# Altium PCB OFP_MCM_v1.6.PcbDoc (part 5 of 8)
Units mm, origin at the board's own origin, x right, y up, seen from the top; angles counter-clockwise.
Board outline 110 x 120 mm, 4 copper layers (Top Layer, Layer 1, Layer 2, Bottom Layer), stack 1.576 mm thick; 381 components, 285 nets, 1332 pads, 552 vias.
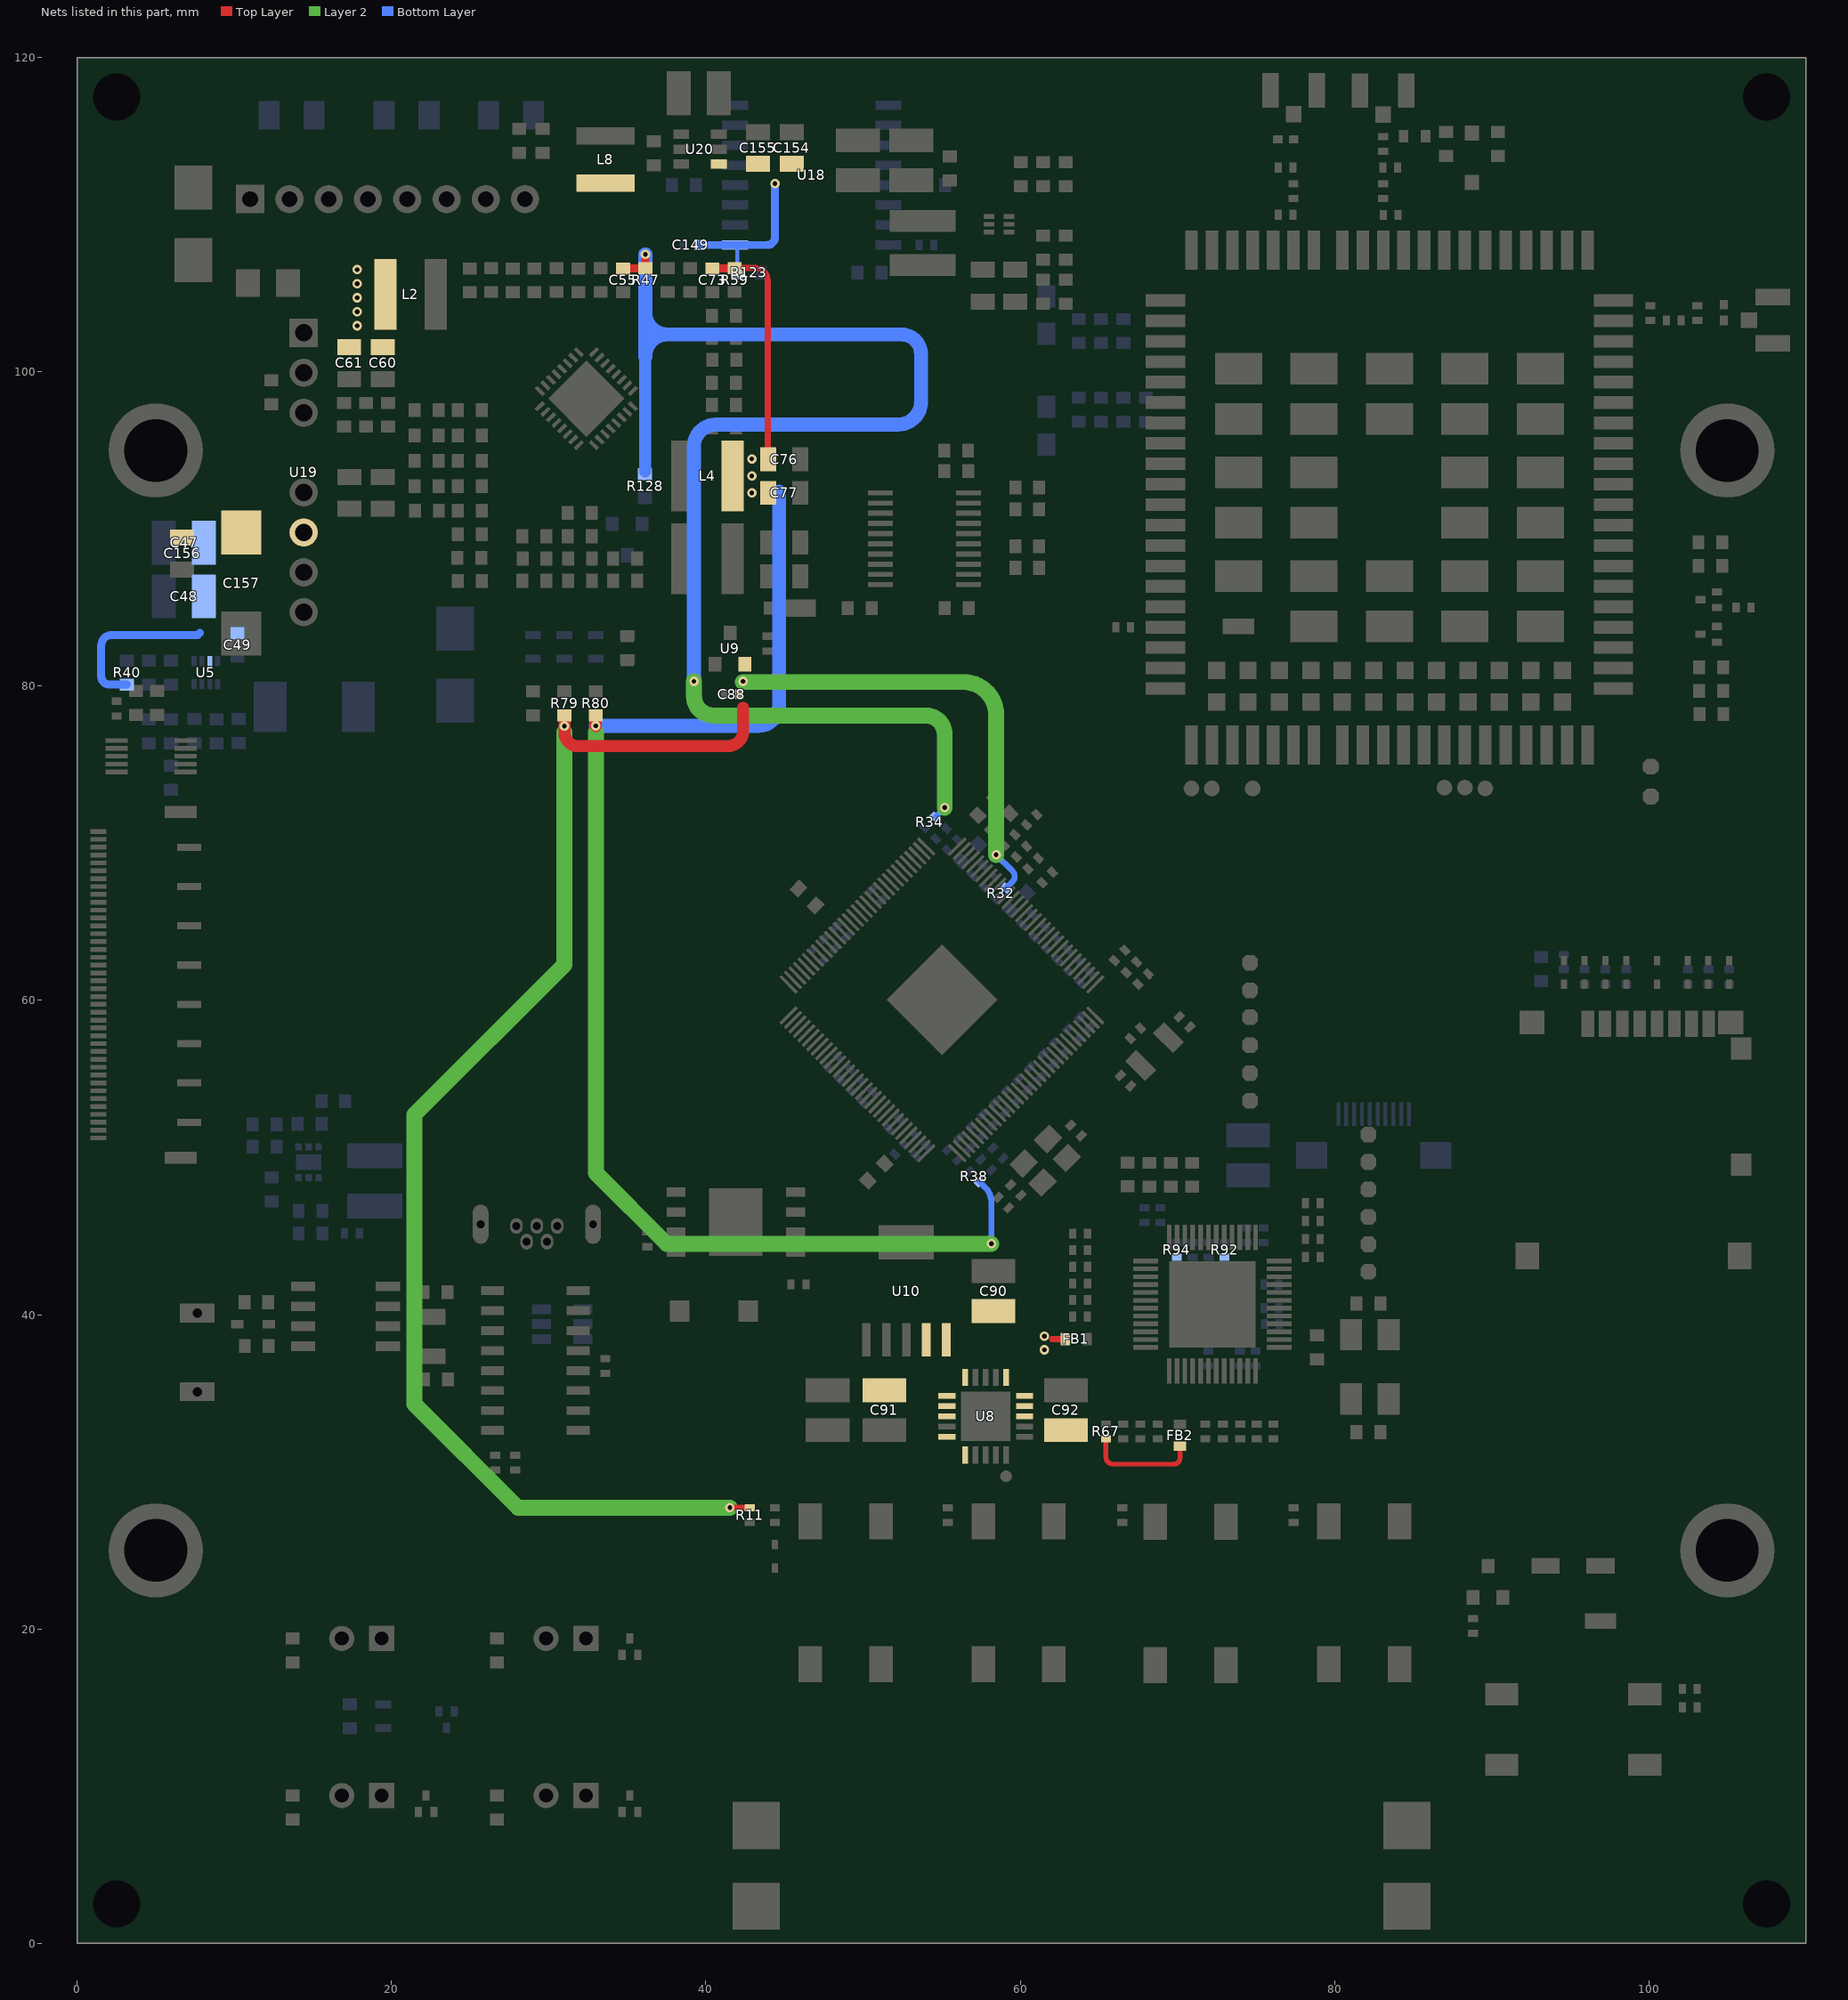
[diagram p4: the nets of this part, all layers, seen from the top]

## Part data (continued)
R79: library part RC0603FR-07499RL, "RES 499 OHM 1% 1/10W 0603", Case Code (Imperial)=0603, Case Code (Metric)=1608, LCSC Part Number=C137714, Manufacturer=Yageo, Max Operating Temperature=155°C, Max Power Dissipation=100mW, Min Operating Temperature=-55°C, Package Quantity=1, Resistor Type="Thick Film", Supplier Part Number 1=1995585, Temperature Coefficient=100ppm/°C, Tolerance=1%, Voltage Rating=50V, Case/Package=0603, Category="Chip SMD Resistors", ComponentLink1Description=https://datasheet.ciiva.com/11808/0900766b80f96399-11808558.pdf?src-supplier=RSComponents, ComponentLink1URL=https://datasheet.ciiva.com/11808/0900766b80f96399-11808558.pdf?src-supplier=RSComponents, ComponentLink2Description=https://datasheet.ciiva.com/2453/pyu-r-int-thick-7-2453956.pdf?src-supplier=Digi-Key, ComponentLink2URL=https://datasheet.ciiva.com/2453/pyu-r-int-thick-7-2453956.pdf?src-supplier=Digi-Key, ComponentLink3Description=https://datasheet.ciiva.com/2453/pyu-r-int-thick-7-2453957.pdf?src-supplier=Digi-Key, ComponentLink3URL=https://datasheet.ciiva.com/2453/pyu-r-int-thick-7-2453957.pdf?src-supplier=Digi-Key, ComponentLink4Description=https://datasheet.ciiva.com/2453/pyu-r-int-thick-7-2453955.pdf?src-supplier=Digi-Key, ComponentLink4URL=https://datasheet.ciiva.com/2453/pyu-r-int-thick-7-2453955.pdf?src-supplier=Digi-Key, ComponentLink5Description=https://datasheet.ciiva.com/12558/rc0603-272842-12558391.pdf?src-supplier=Mouser, ComponentLink5URL=https://datasheet.ciiva.com/12558/rc0603-272842-12558391.pdf?src-supplier=Mouser, ComponentLink6Description=https://datasheet.ciiva.com/8885/pyu-rc0603-51-rohs-l-4-8885483.pdf?src-supplier=Avnet, ComponentLink6URL=https://datasheet.ciiva.com/8885/pyu-rc0603-51-rohs-l-4-8885483.pdf?src-supplier=Avnet, Construction=Rectangular, Contact Plating=Tin,Matte, Depth=0.8mm, Features="Moisture Resistant", Height=0.45mm, Lead Free="Lead Free", Length=1.6mm, Manufacturer Part Number=RC0603FR-07499RL, Military Standard=Not, Mount="Surface Mount", Number of Terminations=2, Packaging="Tape and Reel", Power Rating=100mW, Pricing 1="5000=0.00300, 10000=0.00300, 15000=0.00300, 20000=0.00200 (GBP)", Radiation Hardening=No, Resistance=499R, RoHS=Yes, RoHS Compliant=Yes, Series=RC, Size Code=0603, Stock 1=900, Supplier 1=RSComponents, Technology="THICK FILM", Termination=SMD/SMT, Voltage Rating (DC)=50V, Width=0.031inch
R80: library part RC0603FR-07100RL, "RES SMD 100 OHM 1% 1/10W 0603", Case Code (Imperial)=0603, Case Code (Metric)=1608, LCSC Part Number=C105588, Manufacturer=Yageo, Max Operating Temperature=155°C, Max Power Dissipation=100mW, Min Operating Temperature=-55°C, Resistance Tolerance=1%, Resistor Type="Thick Film", Temperature Coefficient=100ppm/°C, Voltage Rating=50V, Case/Package=0603, Category="Chip SMD Resistors", Construction=Rectangular, Depth=0.8mm, Features="Moisture Resistant", Height=0.45mm, Item Type=Resistor, Lead Free="Lead Free", Length=1.6mm, Manufacturer Part Number=RC0603FR-07100RL, Military Standard=Not, Number of Pins=2, Number of Terminations=2, Packaging="Tape and Reel", Power Rating=100mW, Pricing 1="5000=0.00300, 5000=0.00200, 5000=0.00450, 50000=0.00410, 500000=0.00230, 2500000=0.00140 (USD)", REACH SVHC=Unknown, Resistance=100R, RoHS=Yes, RoHS Compliant=Yes, Series=RC, Size Code=0603, Stock 1=3800000, Supplier 1="Arrow Electronics", Supplier Part Number 1=RC0603FR-07100RL, Technology="THICK FILM", Termination=SMD/SMT, Tolerance=1%, Voltage Rating (DC)=50V, Width=0.8mm
R86: library part RC0603FR-0710RL, "RES SMD 10 OHM 1% 1/10W 0603", Case Code (Imperial)=0603, Case Code (Metric)=1608, LCSC Part Number=C109318, Manufacturer=Yageo, Max Operating Temperature=155°C, Min Operating Temperature=-55°C, Power Rating=100mW, Supplier Part Number 1=311-10.0HRDKR-ND, Temperature Coefficient=200ppm/°C, Tolerance=1%, Voltage Rating=50V, Case/Package=0603, ComponentLink1Description=http://www.farnell.com/datasheets/1868787.pdf?src-supplier=Element14, ComponentLink1URL=http://www.farnell.com/datasheets/1868787.pdf?src-supplier=Element14, ComponentLink2Description=http://www.yageo.com/documents/recent/PYu-RC0603_51_RoHS_L_4.pdf?src-supplier=Avnet, ComponentLink2URL=http://www.yageo.com/documents/recent/PYu-RC0603_51_RoHS_L_4.pdf?src-supplier=Avnet, ComponentLink3Description=http://documents.rs-components.com/techlib://itc_doclist_GB.htm?stockno=5048984&src-supplier=RSComponents, ComponentLink3URL=http://documents.rs-components.com/techlib://itc_doclist_GB.htm?stockno=5048984&src-supplier=RSComponents, ComponentLink4Description=http://www.yageo.com/documents/recent/PYu-RC0603_51_RoHS_L_4.pdf?src-supplier=Avnet+Europe, ComponentLink4URL=http://www.yageo.com/documents/recent/PYu-RC0603_51_RoHS_L_4.pdf?src-supplier=Avnet+Europe, Composition="Thick Film", Contact Plating=Tin,Matte, Depth=0.8mm, Height=0.45mm, Item Type=Resistor, Lead Free="Lead Free", Length=1.6mm, Manufacturer Part Number=RC0603FR-0710RL, Military Standard=Not, Number of Pins=2, Packaging="Tape and Reel", Pricing 1="1=0.1, 10=0.046, 100=0.0187, 1000=0.0084, 2500=0.00729 (USD)", Radiation Hardening=No, REACH SVHC="No SVHC", Resistance=10R, Stock 1=10836596, Supplier 1=Digi-Key, Termination=SMD/SMT, Voltage Rating (DC)=50V, Width=0.8mm
R87: library part RT0402BRE079K53L, "63mW Thin Film Resistor ±50ppm/℃ ±0.1% 9.53kΩ 0402 Chip Resistor - Surface Mount ROHS", Case/Package=0402, LCSC Part Number=C853448, Manufacturer=Yageo, Max Operating Temperature=155°C, Max Power Dissipation=63mW, Min Operating Temperature=-55°C, Temperature Coefficient=50ppm/°C, Tolerance=0.1%, Voltage Rating=50V, ComponentLink1Description=https://datasheet.ciiva.com/2582/pyu-rt-1-to-0-05-rohs-l-5-2582995.pdf?src-supplier=Digikey, ComponentLink1URL=https://datasheet.ciiva.com/2582/pyu-rt-1-to-0-05-rohs-l-5-2582995.pdf?src-supplier=Digikey, Item Type=Resistors, Lead Free="Lead Free", Manufacturer Part Number=RT0402BRE079K53L, Number of Terminations=2, Packaging="Tape and Reel", Pricing="10000=0.074, 20000=0.064, 30000=0.059, 50000=0.052 (USD)", RoHS=Yes, RoHS Compliant=Yes, Series=RT, Supplier=Newark, Voltage Rating (DC)=50V
R88: library part RC0603FR-0790K9L, "RES 90.9K OHM 1% 1/10W 0603", LCSC Part Number=C185305, Manufacturer=Yageo, Voltage Rating (DC)=50V, ComponentLink1Description=https://datasheet.ciiva.com/15189/getdatasheetpartid-325203-15189835.pdf?src-supplier=Verical, ComponentLink1URL=https://datasheet.ciiva.com/15189/getdatasheetpartid-325203-15189835.pdf?src-supplier=Verical, Item Type=Resistors, Lead Free=5697LeadFree, Manufacturer Part Number=RC0603FR-0790K9L, Pricing="5000=0.0022, 50000=0.0021, 150000=0.0021, 375000=0.002, 1000000=0.0019 (USD)", RoHS=Yes, RoHS Compliant=5897YesNo, Stock=100000, Supplier="Future Electronics"
R93: library part RC0603FR-071ML, "RES SMD 1M OHM 1% 1/10W 0603", Case Code (Imperial)=0603, Case Code (Metric)=1608, LCSC Part Number=C105578, Manufacturer=Yageo, Max Operating Temperature=155°C, Min Operating Temperature=-55°C, Package Quantity=5000, Power Rating=100mW, Resistance=1MR, Supplier Part Number 1=311-1.00MHRDKR-ND, Temperature Coefficient=100ppm/°C, Tolerance=1%, Voltage Rating=50V, Case/Package=0603, ComponentLink1Description=http://www.farnell.com/datasheets/2167052.pdf?src-supplier=Mouser, ComponentLink1URL=http://www.farnell.com/datasheets/2167052.pdf?src-supplier=Mouser, ComponentLink2Description=http://www.farnell.com/datasheets/2167052.pdf?src-supplier=Element14, ComponentLink2URL=http://www.farnell.com/datasheets/2167052.pdf?src-supplier=Element14, ComponentLink3Description=http://documents.rs-components.com/techlib://itc_doclist_GB.htm?stockno=5048956&src-supplier=RSComponents, ComponentLink3URL=http://documents.rs-components.com/techlib://itc_doclist_GB.htm?stockno=5048956&src-supplier=RSComponents, Composition="Thick Film", Depth=0.8mm, Height=0.45mm, Item Type=Resistor, Lead Free="Lead Free", Length=1.6mm, Manufacturer Part Number=RC0603FR-071ML, Military Standard=Not, Number of Pins=2, Packaging="Tape and Reel", Pricing 1="1=0.1, 10=0.023, 100=0.0094, 1000=0.00421, 2500=0.00366 (USD)", REACH SVHC="No SVHC", Stock 1=3824601, Supplier 1=Digi-Key, Termination=SMD/SMT, Voltage Rating (DC)=50V, Width=0.8mm
R95 R103: library part RC0603FR-071KL, "RES SMD 1K OHM 1% 1/10W 0603", Case Code (Imperial)=0603, Case Code (Metric)=1608, LCSC Part Number=C22548, Manufacturer=Yageo, Max Operating Temperature=155°C, Min Operating Temperature=-55°C, Power Rating=100mW, Resistance=1kR, Supplier Part Number 1=311-1.00KHRDKR-ND, Temperature Coefficient=100ppm/°C, Tolerance=1%, Voltage Rating=50V, Case/Package=0603, ComponentLink1Description=https://www.verical.com/server-webapp/html/getDatasheet?partID=409289&src-supplier=Verical, ComponentLink1URL=https://www.verical.com/server-webapp/html/getDatasheet?partID=409289&src-supplier=Verical, ComponentLink2Description=http://documents.rs-components.com/techlib://itc_doclist_GB.htm?stockno=5048928&src-supplier=RSComponents, ComponentLink2URL=http://documents.rs-components.com/techlib://itc_doclist_GB.htm?stockno=5048928&src-supplier=RSComponents, ComponentLink3Description=http://www.yageo.com/documents/recent/PYu-RC0603_51_RoHS_L_4.pdf?src-supplier=Avnet+Europe, ComponentLink3URL=http://www.yageo.com/documents/recent/PYu-RC0603_51_RoHS_L_4.pdf?src-supplier=Avnet+Europe, ComponentLink4Description=http://www.farnell.com/datasheets/2167052.pdf?src-supplier=Element14, ComponentLink4URL=http://www.farnell.com/datasheets/2167052.pdf?src-supplier=Element14, ComponentLink5Description=http://www.farnell.com/datasheets/1868787.pdf?src-supplier=Element14, ComponentLink5URL=http://www.farnell.com/datasheets/1868787.pdf?src-supplier=Element14, ComponentLink6Description=http://www.yageo.com/documents/recent/PYu-RC_Group_51_RoHS_L_2.pdf?src-supplier=Avnet, ComponentLink6URL=http://www.yageo.com/documents/recent/PYu-RC_Group_51_RoHS_L_2.pdf?src-supplier=Avnet, ComponentLink7Description=https://www.verical.com/server-webapp/html/getDatasheet?partID=404327&src-supplier=Verical, ComponentLink7URL=https://www.verical.com/server-webapp/html/getDatasheet?partID=404327&src-supplier=Verical, ComponentLink8Description=http://www.farnell.com/datasheets/443971.pdf?src-supplier=Element14, ComponentLink8URL=http://www.farnell.com/datasheets/443971.pdf?src-supplier=Element14, Composition="Thick Film", Contact Plating=Tin,Matte, Depth=0.8mm, Height=0.45mm, Item Type=Resistor, Lead Free="Lead Free", Length=1.6mm, Manufacturer Part Number=RC0603FR-071KL, Military Standard=Not, Packaging="Tape and Reel", Pricing 1="1=0.1, 10=0.023, 100=0.0094, 1000=0.0042, 2500=0.0037 (USD)", Radiation Hardening=No, REACH SVHC="No SVHC", Stock 1=21472395, Supplier 1=Digi-Key, Termination=SMD/SMT
R102: library part RC0603FR-0747KL, "RES 47K OHM 1% 1/10W 0603", Case Code (Imperial)=0603, Case Code (Metric)=1608, LCSC Part Number=C105579, Manufacturer=Yageo, Max Operating Temperature=155°C, Max Power Dissipation=100mW, Min Operating Temperature=-55°C, Package Quantity=1, Resistance Tolerance=1%, Resistor Type="Thick Film", Temperature Coefficient=100ppm/°C, Voltage Rating=50V, Case/Package=0603, Depth=0.8mm, Features="Moisture Resistant", Height=0.022inch, Item Type=Resistors, Lead Free=5697LeadFree, Length=0.063inch, Manufacturer Part Number=RC0603FR-0747KL, Number of Terminations=2, Packaging="Tape and Reel", Pins=2, Power Rating=100mW, Pricing="100=0.078, 1000=0.071, 2500=0.068, 5000=0.062, 10000=0.057 (SEK)", Radiation Hardening=5898YesNo, Reach SVHC Compliant=Unknown, RoHS=Yes, RoHS Compliant=Yes, Series=RC, Stock=3100, Supplier=Rs, Technology="THICK FILM", Termination=SMD/SMT, Tolerance=1%, Voltage Rating (AC)=50V, Voltage Rating (DC)=50V, Width=0.031inch
R105 R106 R107 R108: library part RC0603FR-0722RL, "RES 22 OHM 1% 1/10W 0603", Case Code (Imperial)=0603, Case Code (Metric)=1608, LCSC Part Number=C107701, Manufacturer=Yageo, Max Operating Temperature=155°C, Max Power Dissipation=100mW, Min Operating Temperature=-55°C, Package Quantity=1, Resistance Tolerance=1%, Resistor Type="Thick Film", Temperature Coefficient=100ppm/°C, Voltage Rating=50V, Case/Package=0603, Category="Chip SMD Resistors", ComponentLink1Description=https://datasheet.ciiva.com/11819/0900766b80f96399-11819285.pdf?src-supplier=RSComponents, ComponentLink1URL=https://datasheet.ciiva.com/11819/0900766b80f96399-11819285.pdf?src-supplier=RSComponents, ComponentLink2Description=https://datasheet.ciiva.com/46395/443971-46395032.pdf?src-supplier=Element14, ComponentLink2URL=https://datasheet.ciiva.com/46395/443971-46395032.pdf?src-supplier=Element14, ComponentLink3Description=https://datasheet.ciiva.com/46440/1868787-46440901.pdf?src-supplier=Element14, ComponentLink3URL=https://datasheet.ciiva.com/46440/1868787-46440901.pdf?src-supplier=Element14, ComponentLink4Description=https://datasheet.ciiva.com/2454/pyu-r-int-thick-7-2454355.pdf?src-supplier=Digi-Key, ComponentLink4URL=https://datasheet.ciiva.com/2454/pyu-r-int-thick-7-2454355.pdf?src-supplier=Digi-Key, ComponentLink5Description=https://datasheet.ciiva.com/2454/pyu-r-int-thick-7-2454356.pdf?src-supplier=Digi-Key, ComponentLink5URL=https://datasheet.ciiva.com/2454/pyu-r-int-thick-7-2454356.pdf?src-supplier=Digi-Key, ComponentLink6Description=https://datasheet.ciiva.com/2454/pyu-r-int-thick-7-2454354.pdf?src-supplier=Digi-Key, ComponentLink6URL=https://datasheet.ciiva.com/2454/pyu-r-int-thick-7-2454354.pdf?src-supplier=Digi-Key, Construction=Rectangular, Depth=0.8mm, Features="Moisture Resistant", Height=0.022inch, Item Type=Resistor, Lead Free="Lead Free", Length=0.063inch, Manufacturer Part Number=RC0603FR-0722RL, Military Standard=Not, Number of Pins=2, Number of Terminations=2, Packaging="Tape and Reel", Power Rating=100mW, Pricing 1="5000=0.00133, 10000=0.00131, 20000=0.00127 (USD)", Reach SVHC Compliant=Yes, Resistance=22R, RoHS=Yes, RoHS Compliant=Yes, Series=RC, Size Code=0603, Stock 1=190000, Supplier 1=Avnet, Supplier Part Number 1=RC0603FR-0722RL, Technology="THICK FILM", Termination=SMD/SMT, Tolerance=1%, Voltage Rating (DC)=50V, Width=0.031inch
R111: library part RC0603FR-074K7L, "RES SMD 4.7K OHM 1% 1/10W 0603", LCSC Part Number=C99782, Manufacturer=Yageo, Package=0603, ComponentLink7Description=LCSC, ComponentLink7URL=https://www.lcsc.com/product-detail/Chip-Resistor-Surface-Mount_YAGEO-RC0603FR-074K7L_C99782.html, Item Type=Resistor, Manufacturer Part Number=RC0603FR-074K7L
R112: library part RC0603FR-0710RL, "RES SMD 10 OHM 1% 1/10W 0603", Case Code (Imperial)=0603, Case Code (Metric)=1608, LCSC Part Number=C109318, Manufacturer=Yageo, Max Operating Temperature=155°C, Min Operating Temperature=-55°C, Power Rating=100mW, Resistance=10R, Supplier Part Number 1=311-10.0HRDKR-ND, Temperature Coefficient=200ppm/°C, Tolerance=1%, Voltage Rating=50V, Case/Package=0603, ComponentLink1Description=http://www.farnell.com/datasheets/1868787.pdf?src-supplier=Element14, ComponentLink1URL=http://www.farnell.com/datasheets/1868787.pdf?src-supplier=Element14, ComponentLink2Description=http://www.yageo.com/documents/recent/PYu-RC0603_51_RoHS_L_4.pdf?src-supplier=Avnet, ComponentLink2URL=http://www.yageo.com/documents/recent/PYu-RC0603_51_RoHS_L_4.pdf?src-supplier=Avnet, ComponentLink3Description=http://documents.rs-components.com/techlib://itc_doclist_GB.htm?stockno=5048984&src-supplier=RSComponents, ComponentLink3URL=http://documents.rs-components.com/techlib://itc_doclist_GB.htm?stockno=5048984&src-supplier=RSComponents, ComponentLink4Description=http://www.yageo.com/documents/recent/PYu-RC0603_51_RoHS_L_4.pdf?src-supplier=Avnet+Europe, ComponentLink4URL=http://www.yageo.com/documents/recent/PYu-RC0603_51_RoHS_L_4.pdf?src-supplier=Avnet+Europe, Composition="Thick Film", Contact Plating=Tin,Matte, Depth=0.8mm, Height=0.45mm, Item Type=Resistor, Lead Free="Lead Free", Length=1.6mm, Manufacturer Part Number=RC0603FR-0710RL, Military Standard=Not, Number of Pins=2, Packaging="Tape and Reel", Pricing 1="1=0.1, 10=0.046, 100=0.0187, 1000=0.0084, 2500=0.00729 (USD)", Radiation Hardening=No, REACH SVHC="No SVHC", Stock 1=10836596, Supplier 1=Digi-Key, Termination=SMD/SMT, Voltage Rating (DC)=50V, Width=0.8mm
R113: library part RC0402FR-070RL, "RES 0 OHM JUMPER 1/16W 0402", Case Code (Imperial)=0402, Case Code (Metric)=1005, LCSC Part Number=C106231, Manufacturer=Yageo, Max Operating Temperature=155°C, Max Power Dissipation=63mW, Min Operating Temperature=-55°C, Power Rating=62.5mW, Resistance=0R, Resistor Type="Thick Film", Supplier Part Number 1=603-RC0402FR-070RL, Temperature Coefficient=200ppm/°C, Tolerance=1%, Voltage Rating=50V, Case/Package=0402, ComponentLink1Description=https://datasheet.ciiva.com/8896/pyu-rc0402-51-rohs-l-6-8896149.pdf?src-supplier=Avnet, ComponentLink1URL=https://datasheet.ciiva.com/8896/pyu-rc0402-51-rohs-l-6-8896149.pdf?src-supplier=Avnet, ComponentLink2Description=https://datasheet.ciiva.com/16790/pyu-rc0402-51-rohs-l-6-r-16790444.pdf?src-supplier=Future+Electronics, ComponentLink2URL=https://datasheet.ciiva.com/16790/pyu-rc0402-51-rohs-l-6-r-16790444.pdf?src-supplier=Future+Electronics, Contact Plating=Tin,Matte, Features="Moisture Resistant", Height=0.35mm, Item Type=Resistors, Lead Free="Lead Free", Length=1mm, Manufacturer Part Number=RC0402FR-070RL, Mount="Surface Mount", Number of Terminations=2, Packaging="Tape and Reel", Pricing 1="1=0.10000, 10=0.01400, 50=0.01400, 100=0.00600, 1000=0.00300, 5000=0.00200, 10000=0.00100 (USD)", Radiation Hardening=No, RoHS=Yes, RoHS Compliant=Yes, Series=RC, Size Code=0402, Stock 1=8556842, Supplier 1=Mouser, Termination=SMD/SMT, Width=0.5mm
R122: library part RC0402JR-0710ML, "RES SMD 10M Ohm 5% 1/16W 0402", Case Code (Imperial)=0402, Case Code (Metric)=1005, LCSC Part Number=C274900, Manufacturer=Yageo, Max Operating Temperature=155°C, Max Power Dissipation=63mW, Min Operating Temperature=-55°C, Package Quantity=1, Power Rating=62.5mW, Resistance=10MR, Resistance Tolerance=5%, Resistor Type="Thick Film", Supplier Part Number 1=311-10MJRCT-ND, Temperature Coefficient=100ppm/°C, Voltage Rating=50V, Case/Package=0402, Category="Chip SMD Resistors", ComponentLink1Description=https://datasheet.ciiva.com/7983/1018594-7983541.pdf?src-supplier=Element14, ComponentLink1URL=https://datasheet.ciiva.com/7983/1018594-7983541.pdf?src-supplier=Element14, ComponentLink2Description=https://datasheet.ciiva.com/2518/pyu-r-int-thick-7-2518904.pdf?src-supplier=Digi-Key, ComponentLink2URL=https://datasheet.ciiva.com/2518/pyu-r-int-thick-7-2518904.pdf?src-supplier=Digi-Key, ComponentLink3Description=https://datasheet.ciiva.com/2518/pyu-r-int-thick-7-2518905.pdf?src-supplier=Digi-Key, ComponentLink3URL=https://datasheet.ciiva.com/2518/pyu-r-int-thick-7-2518905.pdf?src-supplier=Digi-Key, ComponentLink4Description=https://datasheet.ciiva.com/2518/pyu-r-int-thick-7-2518906.pdf?src-supplier=Digi-Key, ComponentLink4URL=https://datasheet.ciiva.com/2518/pyu-r-int-thick-7-2518906.pdf?src-supplier=Digi-Key, ComponentLink5Description=https://datasheet.ciiva.com/12577/pyu-rc0402-51-rohs-l-6-r-12577774.pdf?src-supplier=Mouser, ComponentLink5URL=https://datasheet.ciiva.com/12577/pyu-rc0402-51-rohs-l-6-r-12577774.pdf?src-supplier=Mouser, Construction=Rectangular, Depth=0.5mm, Features="Moisture Resistant", Height=0.016inch, Lead Free="Lead Free", Length=1mm, Manufacturer Part Number=RC0402JR-0710ML, Military Standard=Not, Number of Pins=2, Number of Terminations=2, Packaging="Tape and Reel", Pricing 1="1=0.10000, 10=0.01300, 100=0.00540, 1000=0.00244, 2500=0.00212, 5000=0.00175 (USD)", REACH SVHC="No SVHC", RoHS=Yes, RoHS Compliant=Yes, Series=RC, Size Code=0402, Stock 1=38636, Supplier 1=Digi-Key, Termination=SMD/SMT, Tolerance=5%, Voltage Rating (DC)=50V, Weight=2.3E-05oz, Width=0.02inch
SW1: "SWITCH TACTILE SPST-NO 0.05A 24V", LCSC Part Number=C6558197, Manufacturer="TE Connectivity Alcoswitch", ComponentLink1Description=https://datasheet.ciiva.com/7097/1486952-7097325.pdf?src-supplier=Newark, ComponentLink1URL=https://datasheet.ciiva.com/7097/1486952-7097325.pdf?src-supplier=Newark, ComponentLink2Description=https://datasheet.ciiva.com/1530/1714712-1530976.pdf?src-supplier=Element14, ComponentLink2URL=https://datasheet.ciiva.com/1530/1714712-1530976.pdf?src-supplier=Element14, ComponentLink3Description=https://datasheet.ciiva.com/15184/getdatasheetpartid-167889-15184443.pdf?src-supplier=Verical, ComponentLink3URL=https://datasheet.ciiva.com/15184/getdatasheetpartid-167889-15184443.pdf?src-supplier=Verical, ComponentLink4Description=https://datasheet.ciiva.com/8082/eng-cs-1308111-1-switches-core-program-catalog-0308-8082682.pdf?src-supplier=Avnet, ComponentLink4URL=https://datasheet.ciiva.com/8082/eng-cs-1308111-1-switches-core-program-catalog-0308-8082682.pdf?src-supplier=Avnet, Item Type=Switches, Manufacturer Part Number=FSM6JSMATR, Number of Positions=2NUMBER, RoHS=Yes, RoHS Compliant=5897YesNo, Stock=735, Supplier=Rs
SW2: "Without bracket 50mA 4mm 100000 Times 12V 160gf 3mm 2mm Round Button Standing paste SPST SMD Tactile Switches ROHS", LCSC Part Number=C720477, Manufacturer=XUNPU, Package=SMD, ComponentLink1Description=LCSC, ComponentLink1URL=https://www.lcsc.com/product-detail/Tactile-Switches_XUNPU-TS-1088-AR02016_C720477.html?s_z=n_TS-1088-AR02016, Item Type="Tactile Switch", Manufacturer Part Number=TS-1088-AR02016
SW3 SW4 SW5 SW6: "6mm 12mm Round Button 50mA Standing paste 6mm SPST 12V SMD,6x6mm Tactile Switches ROHS", LCSC Part Number=C455124, Manufacturer=XUNPU, Package=SMD,6x6mm, ComponentLink1Description=LCSC, ComponentLink1URL=https://www.lcsc.com/product-detail/Tactile-Switches_XUNPU-TS-1002S-12026C_C455124.html?s_z=n_TS-1002S-12026C, Item Type="Tactile Switch", Manufacturer Part Number=TS-1002S-12026C
TP1 TP2 TP3 TP4 TP5 TP6 TP7 TP8 TP9 TP10 TP11 TP12 TP13 TP14 TP15: "Test Point ON", Item Type="Test Point", Manufacturer Part Number="TEST POINT 0.5mm Dia"
U1: "LQFP-128-EP(14x14) Microcontrollers (MCU/MPU/SOC) ROHS", LCSC Part Number=C2687449, Manufacturer="Allwinner Tech", Package=LQFP-128-EP(14x14), ComponentLink1Description=LCSC, ComponentLink1URL=https://www.lcsc.com/product-detail/Microcontrollers-MCU-MPU-SOC_Allwinner-Tech-V3s_C2687449.html?s_z=n_V3s, Item Type=IC, Manufacturer Part Number=V3s
U2: "IC FLASH 128MBIT SPI/QUAD 8WSON", Frequency=133MHz, LCSC Part Number=C401662, Manufacturer=Winbond, Max Operating Temperature=85°C, Min Operating Temperature=-40°C, ComponentLink1Description=http://www.winbond.com/resource-files/w25q128jv%20revf%2003272018%20plus.pdf?src-supplier=Digikey, ComponentLink1URL=http://www.winbond.com/resource-files/w25q128jv%20revf%2003272018%20plus.pdf?src-supplier=Digikey, Item Type=IC, Manufacturer Part Number=W25Q128JVEIQ, Memory Format=Non-Volatile,FLASH, Memory Size=128Mb, Mounting Technology="Surface Mount", Packaging=Rail/Tube, Pricing="1=1.92, 10=1.701, 25=1.6224, 63=1.54651, 126=1.49183, 252=1.43909, 504=1.38821, 1008=1.33908, 5040=1.23141 (USD)", RoHS=Yes, RoHS Compliant=Yes, Series=SpiFlash®, Stock=12733, Supplier=Digikey
U3: "IC RTC CLOCK/CALENDAR I2C 8SO", LCSC Part Number=C7440, Manufacturer="NXP Semiconductors", ComponentLink1Description=https://datasheet.ciiva.com/8145/pcf8563-8145180.pdf?src-supplier=Avnet, ComponentLink1URL=https://datasheet.ciiva.com/8145/pcf8563-8145180.pdf?src-supplier=Avnet, ComponentLink2Description=https://datasheet.ciiva.com/1238/pcf8563-1238727.pdf?src-supplier=Digikey, ComponentLink2URL=https://datasheet.ciiva.com/1238/pcf8563-1238727.pdf?src-supplier=Digikey, ComponentLink3Description=https://datasheet.ciiva.com/1238/pcf8563-1238728.pdf?src-supplier=Digikey, ComponentLink3URL=https://datasheet.ciiva.com/1238/pcf8563-1238728.pdf?src-supplier=Digikey, ComponentLink4Description=https://datasheet.ciiva.com/1238/pcf8563-1238773.pdf?src-supplier=Digikey, ComponentLink4URL=https://datasheet.ciiva.com/1238/pcf8563-1238773.pdf?src-supplier=Digikey, ComponentLink5Description=https://datasheet.ciiva.com/16287/pcf8563-16287110.pdf?src-supplier=Future+Electronics, ComponentLink5URL=https://datasheet.ciiva.com/16287/pcf8563-16287110.pdf?src-supplier=Future+Electronics, Item Type=IC, Manufacturer Part Number=PCF8563T/5,518, Pricing="1=0.8372, 10=0.6546, 100=0.5322, 500=0.5102, 1000=0.4872, 2500=0.4562, 5000=0.4356, 10000=0.4016, 25000=0.3863 (USD)", RoHS=Yes, Stock=812, Supplier="Arrow Electronics"
U4: "2Mbps Transceiver USB 2.0 SOP-16 USB ICs ROHS", LCSC Part Number=C84681, Manufacturer=WCH, Package=SOP-16, ComponentLink1Description=LCSC, ComponentLink1URL=https://www.lcsc.com/product-detail/USB-ICs_WCH-Jiangsu-Qin-Heng-CH340C_C84681.html, Item Type=IC, Manufacturer Part Number=CH340C
U5: "IC REG BUCK ADJ 3A SOT583", LCSC Part Number=C3200405, Manufacturer="Texas Instruments", Supplier Part Number=595-TPS62933DRLR, Category="Voltage Regulators - Switching", Item Type=IC, Manufacturer Part Number=TPS62933DRLR, Pricing="1=0.7, 10=0.581, 50=0.581, 100=0.44, 1000=0.297, 10000=0.241 (USD)", RoHS=No, Stock=5259, Supplier=Mouser
U6: "IC REG BCK ADJ 3A/2A TRPL 32VQFN", LCSC Part Number=C138722, Manufacturer="Texas Instruments", ComponentLink1Description=https://datasheet.ciiva.com/29735/tps65261-1-29735186.pdf?src-supplier=Digikey, ComponentLink1URL=https://datasheet.ciiva.com/29735/tps65261-1-29735186.pdf?src-supplier=Digikey, Item Type=IC, Manufacturer Part Number=TPS65261RHBR, Pricing="1=2.78, 10=1.91, 50=1.91, 100=1.71, 1000=1.52, 10000=1.32 (USD)", RoHS=Yes, Stock=3449, Supplier=Mouser
U7: "IC REG BUCK ADJ 3A SOT563", LCSC Part Number=C1513007, Manufacturer="Texas Instruments", Height=600um, Item Type=IC, Length=1.6mm, Manufacturer Part Number=TPS563202DRLR, Number of Channels=1NUMBER, Pins=6NUMBER, Pricing="1=0.29, 10=0.174, 50=0.174, 100=0.131, 1000=0.125, 10000=0.109 (USD)", RoHS=Yes, Stock=5123, Supplier=Mouser, Thickness=550um, Width=1.2mm
U8: "IC REG LIN POS ADJ 1.5A 20VQFN", LCSC Part Number=C129193, Manufacturer="Texas Instruments", ComponentLink1Description=https://datasheet.ciiva.com/4885/sbvs074j-203573-4885874.pdf?src-supplier=Mouser, ComponentLink1URL=https://datasheet.ciiva.com/4885/sbvs074j-203573-4885874.pdf?src-supplier=Mouser, ComponentLink2Description=https://datasheet.ciiva.com/41462/001015037-da-01-en-ic-reg-ldo-adj-tps74801rgwr-vqfn-20-tid-41462882.pdf?src-supplier=Conrad, ComponentLink2URL=https://datasheet.ciiva.com/41462/001015037-da-01-en-ic-reg-ldo-adj-tps74801rgwr-vqfn-20-tid-41462882.pdf?src-supplier=Conrad, ComponentLink3Description=https://datasheet.ciiva.com/14278/tps74801-14278399.pdf?src-supplier=Avnet, ComponentLink3URL=https://datasheet.ciiva.com/14278/tps74801-14278399.pdf?src-supplier=Avnet, ComponentLink4Description=https://datasheet.ciiva.com/31402/tps74801-31402076.pdf?src-supplier=Farnell, ComponentLink4URL=https://datasheet.ciiva.com/31402/tps74801-31402076.pdf?src-supplier=Farnell, ComponentLink5Description=https://datasheet.ciiva.com/2044/tps74801-2044836.pdf?src-supplier=Digikey, ComponentLink5URL=https://datasheet.ciiva.com/2044/tps74801-2044836.pdf?src-supplier=Digikey, ComponentLink6Description=https://datasheet.ciiva.com/2044/tps74801-2044837.pdf?src-supplier=Digikey, ComponentLink6URL=https://datasheet.ciiva.com/2044/tps74801-2044837.pdf?src-supplier=Digikey, ComponentLink7Description=https://datasheet.ciiva.com/2044/tps74801-2044838.pdf?src-supplier=Digikey, ComponentLink7URL=https://datasheet.ciiva.com/2044/tps74801-2044838.pdf?src-supplier=Digikey, Height=1mm, Item Type=IC, Length=5mm, Manufacturer Part Number=TPS74801RGWR, Pricing="1=1.87, 10=1.33, 50=1.33, 100=1.19, 1000=1.04, 10000=1.03 (USD)", RoHS=Yes, Stock=12482, Supplier=Mouser, Thickness=900um, Width=5mm
U9: "IC REG LINEAR 3V 200MA SOT23", LCSC Part Number=C9972, Manufacturer=Torex, Output Voltage=3V, ComponentLink1Description=https://www.torexsemi.com/file/xc6206/XC6206.pdf?src-supplier=Digikey, ComponentLink1URL=https://www.torexsemi.com/file/xc6206/XC6206.pdf?src-supplier=Digikey, ComponentLink2Description=https://datasheet.octopart.com/XC6206P302MR-G-Torex-datasheet-134531119.pdf?src-supplier=TME, ComponentLink2URL=https://datasheet.octopart.com/XC6206P302MR-G-Torex-datasheet-134531119.pdf?src-supplier=TME, Item Type=IC, Manufacturer Part Number=XC6206P302MR-G, Number of Channels=1NUMBER, Pricing="1=0.68, 10=0.543, 50=0.543, 100=0.417, 1000=0.271, 10000=0.214 (USD)", RoHS=Yes, Stock=15826, Supplier=Mouser
U10: "IC REG LINEAR 3.3V 1.5A SOT223-6", Case/Package=SOT-223-6, Dropout Voltage=300mV, Input Bias Current=1mA, LCSC Part Number=595-TPS7A4533DCQR, Manufacturer="Texas Instruments", Max Operating Temperature=125°C, Max Output current=1.5A, Max Output Voltage=3.3V, Max Supply Voltage=20V, Min Current Limit=1.6A, Min Input Voltage=2.1V, Min Operating Temperature=-40°C, Package Quantity=2500, Accuracy=1%, ComponentLink1Description=https://datasheet.ciiva.com/2046/tps7a4515-2046240.pdf?src-supplier=Digikey, ComponentLink1URL=https://datasheet.ciiva.com/2046/tps7a4515-2046240.pdf?src-supplier=Digikey, ComponentLink2Description=https://datasheet.ciiva.com/29569/tps7a4501-29569717.pdf?src-supplier=Digikey, ComponentLink2URL=https://datasheet.ciiva.com/29569/tps7a4501-29569717.pdf?src-supplier=Digikey, ComponentLink3Description=https://datasheet.ciiva.com/29569/tps7a4501-29569718.pdf?src-supplier=Digikey, ComponentLink3URL=https://datasheet.ciiva.com/29569/tps7a4501-29569718.pdf?src-supplier=Digikey, ComponentLink4Description=https://datasheet.ciiva.com/29569/tps7a4501-29569719.pdf?src-supplier=Digikey, ComponentLink4URL=https://datasheet.ciiva.com/29569/tps7a4501-29569719.pdf?src-supplier=Digikey, Item Type=IC, Lead Free="Lead Free", Manufacturer Part Number=TPS7A4533DCQR, Min Output Voltage=3.3V, Number of Outputs=1, Number of Regulators=1, Output Current=1.5A, Output Type=Fixed, Output Voltage=3.3V, Packaging="Tape and Reel", Pins=6, Polarity=Positive, Pricing="1=3.2, 10=2.35, 50=2.35, 100=2.14, 1000=2, 10000=1.87 (USD)", Quiescent Current=1mA, Radiation Hardening=No, RoHS=Yes, RoHS Compliant=Yes, Series=-, Stock=854, Supplier=Mouser
U11: "MSOP-10 Touch Screen Controllers ROHS", LCSC Part Number=C219024, Manufacturer="Shenzhen Nsiway Tech", Package=MSOP-10, ComponentLink1Description=LCSC, ComponentLink1URL=https://www.lcsc.com/product-detail/Touch-Screen-Controllers_Shenzhen-Nsiway-Tech-NS2009_C219024.html?s_z=n_NS2009, Item Type=IC, Manufacturer Part Number=NS2009
U12: "IC LED DRVR RGLTR PWM 30MA 6WSON", LCSC Part Number=C702280, Manufacturer="Texas Instruments", ComponentLink1Description=https://datasheet.ciiva.com/26932/getdatasheetpartid-782062-26932814.pdf?src-supplier=Verical, ComponentLink1URL=https://datasheet.ciiva.com/26932/getdatasheetpartid-782062-26932814.pdf?src-supplier=Verical, ComponentLink2Description=https://datasheet.ciiva.com/24016/slvsbr3-261171-24016309.pdf?src-supplier=Mouser, ComponentLink2URL=https://datasheet.ciiva.com/24016/slvsbr3-261171-24016309.pdf?src-supplier=Mouser, ComponentLink3Description=https://datasheet.ciiva.com/18569/tps61158-18569084.pdf?src-supplier=Digikey, ComponentLink3URL=https://datasheet.ciiva.com/18569/tps61158-18569084.pdf?src-supplier=Digikey, Item Type=IC, Manufacturer Part Number=TPS61158DRVR, Pricing="1=0.81, 10=0.594, 50=0.594, 100=0.489, 1000=0.446, 10000=0.4 (USD)", RoHS=Yes, Stock=6942, Supplier=Mouser
U13: "IC USB 2.0 2PORT HUB IND 48HTQFP", LCSC Part Number=C2864320, Manufacturer="Texas Instruments", ComponentLink1Description=http://www.ti.com/lit/ds/symlink/tusb4020bi.pdf?src-supplier=Digikey, ComponentLink1URL=http://www.ti.com/lit/ds/symlink/tusb4020bi.pdf?src-supplier=Digikey, ComponentLink2Description=http://www.ti.com/general/docs/suppproductinfo.tsp?distId=10&amp;gotoUrl=http%3A%2F%2Fwww.ti.com%2Flit%2Fgpn%2Ftusb4020bi&src-supplier=Digikey, ComponentLink2URL=http://www.ti.com/general/docs/suppproductinfo.tsp?distId=10&amp;gotoUrl=http%3A%2F%2Fwww.ti.com%2Flit%2Fgpn%2Ftusb4020bi&src-supplier=Digikey, Item Type=IC, Manufacturer Part Number=TUSB4020BIPHPR, Pricing="1=4.5, 10=3.15, 50=3.15, 100=2.85, 1000=2.55, 10000=2.52 (USD)", RoHS=Yes, Stock=2703, Supplier=Mouser
U14: "RF TXRX MOD CELLULARCARD EDGE", Manufacturer="Quectel Wireless Solutions", Supplier Part Number=277-EC21EFA-512-STD, ComponentLink1Description=https://datasheet.octopart.com/EC21EFA-512-STD-Quectel-datasheet-163886073.pdf?src-supplier=SOS+electronic, ComponentLink1URL=https://datasheet.octopart.com/EC21EFA-512-STD-Quectel-datasheet-163886073.pdf?src-supplier=SOS+electronic, Item Type=IC, Manufacturer Part Number=EC21EFA-512-STD, Pricing="1=59.46, 10=47.77, 50=42.24, 100=40.31, 1000=38.16, 10000=38.16 (USD)", RoHS=No, Stock=210, Supplier=Mouser
U15: "IC TRANSLATOR BIDIR 20TSSOP", LCSC Part Number=C17206, Manufacturer="Texas Instruments", Package=20-TSSOP, ComponentLink1Description=LCSC, ComponentLink1URL=https://www.lcsc.com/product-detail/Translators-Level-Shifters_Texas-Instruments-TXS0108EPWR_C17206.html, Item Type=IC, Manufacturer Part Number=TXS0108EPWR
U17: "6A 12V 150W 6V Unidirectional 5V SOT-23-6 ESD and Surge Protection (TVS/ESD) ROHS", LCSC Part Number=C2827654, Manufacturer="TECH PUBLIC", Package=SOT-23-6, ComponentLink1Description=LCSC, ComponentLink1URL=https://www.lcsc.com/product-detail/ESD-and-Surge-Protection-TVS-ESD_TECH-PUBLIC-USBLC6-2SC6_C2827654.html, Item Type=(TVS/ESD), Manufacturer Part Number=USBLC6-2SC6
U18: "DG ISO 5KV 4CH CAN/RS232 16-SOIC", LCSC Part Number=C5216408, Manufacturer="Texas Instruments", Item Type=IC, Manufacturer Part Number=ISO6742FDWR, Pricing="1=2.23, 10=1.651, 25=1.506, 100=1.3468, 250=1.27092, 500=1.2252, 1000=1.18756 (USD)", RoHS=No, Stock=6799, Supplier=Digikey
U19: "10W wide-voltage input, isolated and regulated single-channel/positive-negative dual-channel output DC/DC power supply module", LCSC Part Number=C7468825, Manufacturer=YLPTEC, Package=DIP, ComponentLink1Description=LCSC, ComponentLink1URL=https://www.lcsc.com/product-detail/C7468825.html?s_z=n_VRB1212S-10WR3, Item Type=Module, Manufacturer Part Number=VRB1212S-10WR3
U20: "IC REG BUCK 3.3V 2A TSOT26", LCSC Part Number=C780769, Manufacturer=Diodes, Supplier Part Number=6109504, Category="Voltage Regulators - Switching", ComponentLink1Description=https://www.diodes.com/assets/Datasheets/AP63200-AP63201-AP63203-AP63205.pdf?src-supplier=Digi-Key, ComponentLink1URL=https://www.diodes.com/assets/Datasheets/AP63200-AP63201-AP63203-AP63205.pdf?src-supplier=Digi-Key, Item Type=IC, Manufacturer Part Number=AP63203WU-7, Pricing="3000=0.34, 6000=0.335, 9000=0.33, 12000=0.33, 15000=0.32 (USD)", RoHS=Yes, Stock=3000, Supplier="Future Electronics"
X1: library part 7M24000192, "24MHz Surface Mount Crystal 12pF ±10ppm ±10ppm SMD3225-4P Crystals ROHS", LCSC Part Number=C331579, Manufacturer="TXC Corp", Package=SMD3225-4P, ComponentLink1Description=LCSC, ComponentLink1URL=https://www.lcsc.com/product-detail/Crystals_TXC-Corp-7M24000192_C331579.html, Item Type=Crytal, Manufacturer Part Number=7M24000192
X2 X3: library part CM315D32768DZFT, "CRYSTAL 32.7680KHZ 12.5PF SMD", LCSC Part Number=C182057, Manufacturer=Citizen, ComponentLink1Description=https://datasheet.ciiva.com/16437/cm315-16437047.pdf?src-supplier=Future+Electronics, ComponentLink1URL=https://datasheet.ciiva.com/16437/cm315-16437047.pdf?src-supplier=Future+Electronics, Item Type=Crystals, Lead Free=5697LeadFree, Manufacturer Part Number=CM315D32768DZFT, Pricing="1=0.5, 10=0.432, 50=0.3892, 100=0.3723, 500=0.3358, 1000=0.32128 (USD)", RoHS=Yes, Stock=343217, Supplier=Digikey
X4: library part X503224MSB4SI, "24MHz Surface Mount Crystal 20pF ±10ppm ±20ppm SMD5032-4P Crystals ROHS", LCSC Part Number=C112587, Manufacturer=YXC, Item Type=Crystal, Manufacturer Part Number=X503224MSB4SI, Pricing="5=0.2572, 50=0.2054, 150=0.1832, 1000=0.1377, 2000=0.1253, 5000=0.1179 (USD)", RoHS=No, Stock=390, Supplier=LCSC

## Free pads (board coordinates)
  rrect13% 0.94x0.44 on Top Overlay: 1(38.115,47.805) 1(45.885,47.805)
  round 1 smd: 2(70.9,73.492) 2(72.2,73.492) 2(74.8,73.492) 2(87,73.542) 2(88.3,73.542) 2(89.6,73.492)
  rect 3x3 smd: MH1(43.2,2.35) MH2(43.2,7.5) MH3(84.6,7.5) MH4(84.6,2.35)
  rect 3x3 smd far side: MH1(43.2,2.35) MH2(43.2,7.5) MH3(84.6,7.5) MH4(84.6,2.35)
  round 0 hole 3: MH2(2.5,2.5) MH2(2.5,117.5) MH2(107.5,2.5) MH2(107.5,117.5)
  round 6 hole 4: MH2(5,25) MH2(5,95) MH2(105,25) MH2(105,95)

## Via types
v1: diameter 0.6, hole 0.3, Top Layer to Bottom Layer, tented both sides, 552 vias

## Nets (pads, with @x,y where several pads share a name; then routed paths per layer and width w, separated by ;. In a path a pad name is that pad's centre, name@x,y a point inside that pad or via, vN(x,y) a via of type N, cw(c..) or ccw(c..) an arc to the next point about the centre after c; other vN are vias at no path point)
1.1V-HUB: C92.2 FB2.1 R67.2 U8.1 U8.18 U8.19 U8.20 | length 7.1
  Top Layer w0.305: R67.2@65.459,32.108 65.459,30.943 ccw(c65.911,30.943) 65.911,30.492 69.775,30.492 ccw(c69.775,30.888) 70.172,30.888 FB2.1@70.172,31.627
3.3V-HUB: C90.2 C91.2 FB1.1 R92.2 R94.2 U8.5 U8.6 U8.7 U8.8 U8.10 U8.11 U10.4 U10.5 | length 0.9
  Top Layer w0.178: 62.019,38.443 62.019,38.45
  Top Layer w0.381: 62.019,38.45 FB1.1@62.868,38.45
  other v1: 61.544,37.77 61.544,38.625
3V3-I: C149.2 C154.2 C155.2 L8.2 R123.1 U18.1 U20.1 | length 10.3
  Bottom Layer w0.254: U18.1@41.861,108.076 41.99,107.947 R123.1@41.99,106.325
  Bottom Layer w0.508: C149.2@39.572,108.076 U18.1@41.861,108.076 43.901,108.076 ccw(c43.901,108.574) 44.399,108.574 v1(44.399,111.989)
12V: C47.2 C48.2 C49.2 C156.2 C157.1 R40.1 U5.3 U19.6 | length 10.6
  Bottom Layer w0.508: R40.1@3.162,80.095 2.074,80.095 cw(c2.074,80.645) 1.524,80.645 1.524,82.577 cw(c2.203,82.577) 2.203,83.256 7.663,83.256 7.796,83.389
+1.2V: C55.1 C60.2 C61.2 L2.2 R34.1 R47.1 R128.1 | length 95.4
  Top Layer w0.203: R47.1@36.128,106.587 R47.1@36.153,106.613
  Top Layer w0.508: C55.1@34.732,106.587 R47.1@36.128,106.587 ; R47.1@36.153,106.613 v1(36.153,107.479)
  Layer 2 w1.016: v1(39.243,80.304) 39.243,79.372 ccw(c40.477,79.372) 40.477,78.138 53.982,78.138 cw(c53.982,76.92) 55.2,76.92 v1(55.2,72.271)
  Bottom Layer w0.254: R128.1@35.95,93.48 R128.1@36.142,93.673
  Bottom Layer w0.381: R34.1@54.632,71.703 v1(55.2,72.271)
  Bottom Layer w0.762: R128.1@36.142,93.673 36.142,100.982
  Bottom Layer w0.889: 36.142,100.982 36.153,100.982 36.153,100.993 ; v1(36.153,107.479) 36.153,103.771 ; v1(39.243,80.304) 39.243,95.249 cw(c40.638,95.249) 40.638,96.643 52.224,96.643 ccw(c52.224,98.12) 53.701,98.12 53.701,101.125 ccw(c52.444,101.125) 52.444,102.382 37.542,102.382 ; 36.153,100.993 cw(c37.542,100.993) 37.542,102.382 ; 36.153,100.993 36.153,103.771 ; 36.153,103.771 ccw(c37.542,103.771) 37.542,102.382
  other v1: 17.813,102.934 17.813,103.829 17.813,104.721 17.813,105.616 17.813,106.508
+1.8V: C73.1 C76.2 C77.2 L4.2 R38.1 R59.2 R80.2 | length 101.3
  Top Layer w0.381: R59.2@41.836,106.613 43.155,106.613 cw(c43.155,105.825) 43.942,105.825 43.942,94.456 ccw(c43.967,94.456) C76.2@43.967,94.431
  Top Layer w0.508: C73.1@40.416,106.587 R59.2@41.811,106.587
  Top Layer w0.762: v1(33,77.473) R80.2@33,78.138
  Layer 2 w1.016: 33,77.092 cw(c31.991,76.976) 33.007,76.976 33.007,49.012 37.499,44.52 v1(58.167,44.52)
  Bottom Layer w0.381: R38.1@57.412,48.461 57.439,48.434 57.789,48.084 cw(c56.878,47.172) 58.167,47.172 v1(58.167,44.52)
  Bottom Layer w0.889: v1(33,77.473) 43.335,77.473 ccw(c43.335,78.797) 44.659,78.797 44.659,92.392
  other v1: 42.926,92.304 42.926,93.383 42.926,94.463
+3.0V: C88.2 R11.2 R32.1 R79.2 U9.2 | length 114.8
  Top Layer w0.381: v1(41.529,27.723) R11.2@42.8,27.723
  Top Layer w0.762: R79.2@31,78.138 31,77.048 ccw(c31.864,77.048) 31.864,76.184 41.408,76.184 ccw(c41.408,77.159) 42.382,77.159 42.382,78.636
  Layer 2 w1.016: 31,77.082 31,62.275 21.458,52.733 21.458,34.306 28.041,27.723 v1(41.529,27.723) ; v1@42.367,80.264 56.388,80.264 cw(c56.388,78.177) 58.475,78.177 v1(58.475,69.272)
  Bottom Layer w0.381: v1(58.475,69.272) 59.513,68.234 cw(c59.178,67.899) 59.513,67.564 R32.1@59.094,67.145 R32.1@59.09,67.141
  other v1: 31,77.463 42.367,80.304